# Altium PCB Zotino.PCBDOC (part 4 of 10)
Units mm, origin at the board's own origin, x right, y up, seen from the top; angles counter-clockwise.
Board outline 160.1 x 100.1 mm, 4 copper layers (TopLayer, Internal Plane 2, Signal Layer 1, BottomLayer), stack 1.563 mm thick; 759 components, 378 nets, 2272 pads, 779 vias.
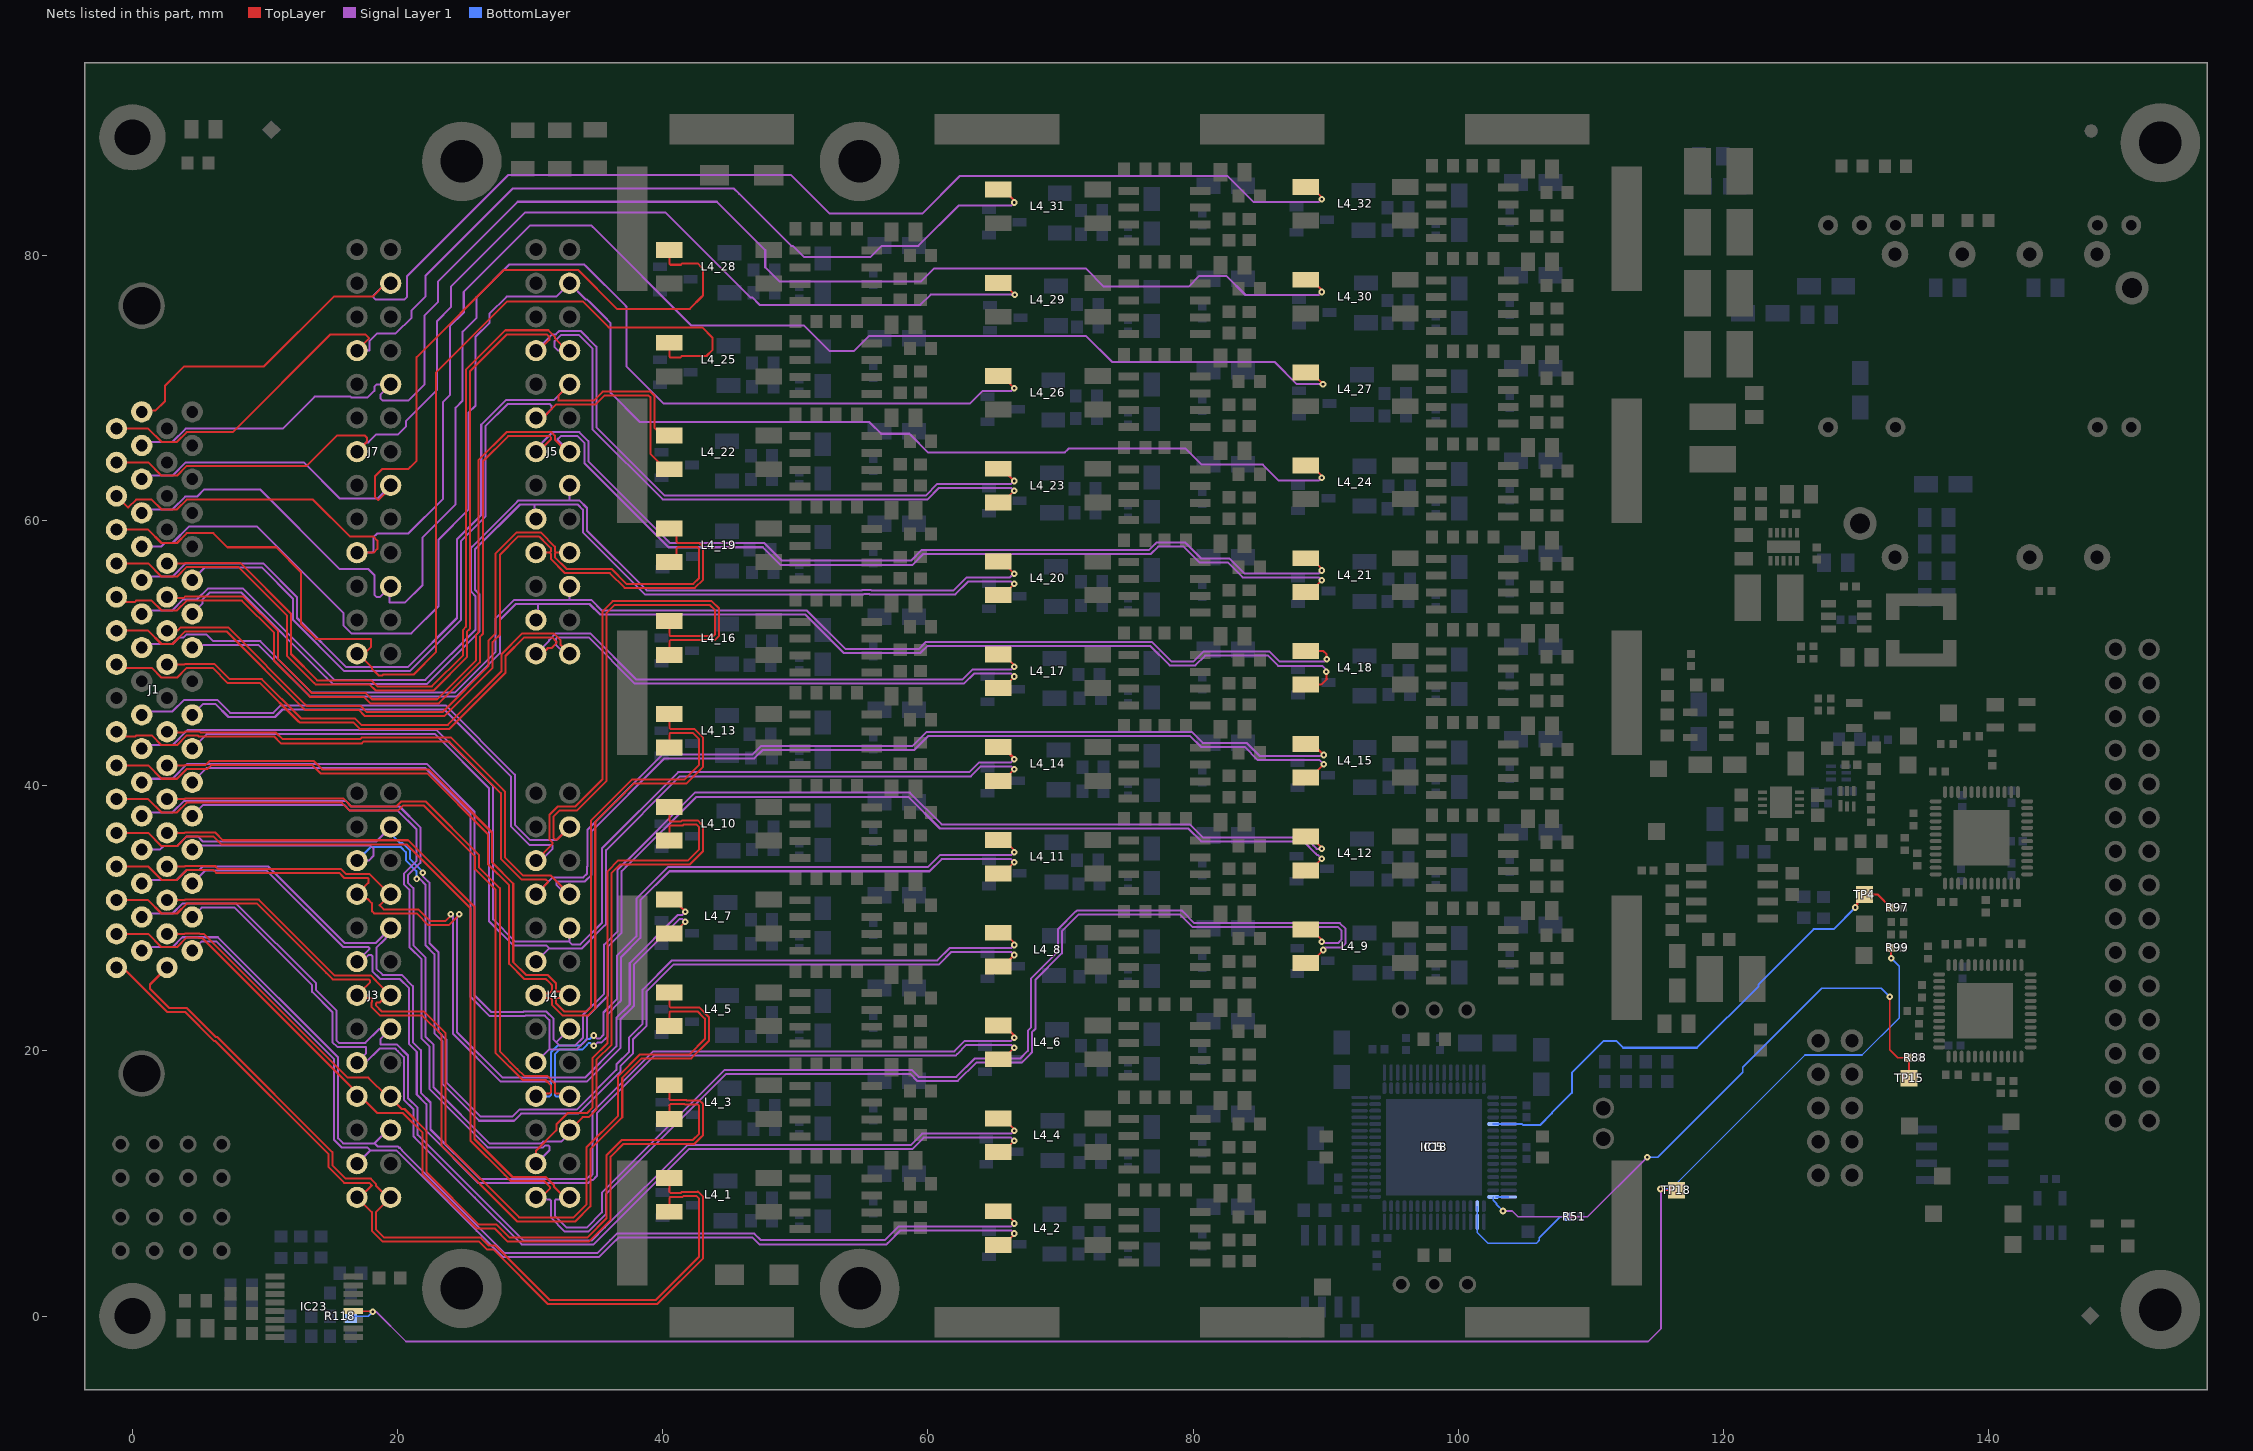
[diagram p5: the nets of this part, all layers, seen from the top]

## Part data (continued)
IC1: library part DC/DC_CC6-1212DF-E, "CONV DC/DC 6W DUAL 12V +-12V PCB", Manufacturer="TDK-Lambda Americas Inc.", Author=GK, Bonding=No, ComponentHeight=10.45mm, Component Type=Standard, CreateDate=17.12.2016, Device=CC6-1212DF-E, LatestRevisionDate=17.12.2016, Manufacturer Part Number=CC6-1212DF-E, Mounted=Yes, PackageDescription="CC6 Series, Body 0.900 x 0.831 x 0.335, Regulated", Part Description="CONV DC/DC 6W DUAL 12V +-12V PCB", Part Number=CC6-1212DF-E, Pin Count=7, PressFit=No, Sense=No, SMD=No, Socket=No
IC2_1 IC2_2 IC2_3 IC2_4 IC2_5 IC2_6 IC2_7 IC2_8 IC2_9 IC2_10 IC2_11 IC2_12 IC2_13 IC2_14 IC2_15 IC2_16 IC2_17 IC2_18 IC2_19 IC2_20 IC2_21 IC2_22 IC2_23 IC2_24 IC2_25 IC2_26 IC2_27 IC2_28 IC2_29 IC2_30 IC2_31 IC2_32: library part OA_OPA197, "36-V, Precision, Rail-to-Rail Input/Output, Low Offset Voltage, Operational Amplifiers", Case=SOIC8, Manufacturer="TEXAS INSTRUMENTS", Author=GK, Bonding=No, ComponentHeight=1.75mm, Component Type=Standard, CreateDate=22.07.2015, Device=OPA197ID, HelpURL=\\cern.ch\dfs\Applications\Altium\Datasheets\OPA192ID.pdf, LatestRevisionDate=22.07.2015, Manufacturer Part Number=OPA197ID, Mounted=Yes, PackageDescription="SOIC 8, Pitch 1.27mm - Body 4x5mm, IPC Medium Density", Part Description="36-V, Precision, Rail-to-Rail Input/Output, Low Offset Voltage, Operational Amplifiers", Part Number=OPA197ID, Pin Count=5, PressFit=No, Sense=No, SMD=Yes, Socket=No
IC3: "1ppm/°C, Low-Noise, Precision, +5.000V Voltage Reference", Case=SOIC8, Manufacturer=MAXIM, Author="CERN DEM JMW", Bonding=No, ComponentHeight=1.75mm, Component Type=Standard, CreateDate=06.07.2015, Device=MAX6250ACSA+, HelpURL=\\cern.ch\dfs\Applications\Altium\Datasheets\MAX6250ACSA+.pdf, LatestRevisionDate=06.07.2015, Manufacturer Part Number=MAX6250ACSA+, Mounted=Yes, PackageDescription="SOIC 8, Pitch 1.27mm, Body 4x5mm, IPC Medium Density", Part Description="1ppm/°C, Low-Noise, Precision, +5.000V Voltage Reference", Part Number=MAX6250ACSA+, Pin Count=5, PressFit=No, Sense=No, SMD=Yes, Socket=No
IC4: "200mA, Low Noise, Low Dropout Negative Micropower Regulator", Case=SOT23-5, Manufacturer="LINEAR TECHNOLOGY", Author="CERN DEM MR", Bonding=No, ComponentHeight=1mm, Component Type=Standard, CreateDate=17.02.2016, Device=LT1964ES5-BYP#TRMPBF, HelpURL=\\cern.ch\dfs\Applications\Altium\Datasheets\LT1964ES5-BYP#TRMPBF.pdf, LatestRevisionDate=17.02.2016, Manufacturer Part Number=LT1964ES5-BYP#TRMPBF, Mounted=Yes, PackageDescription="SOT23, 0.95mm pitch; 5 pin, 1.75mm W X 3.00mm L, IPC Medium Density", Part Description="-1.22V to -20V, 200mA, Low Noise, Low Dropout Negative Micropower Regulator", Part Number=LT1964ES5-BYP#TRMPBF, Pin Count=5, PressFit=No, Sense=No, SMD=Yes, Socket=No
IC5: library part DAC_AD5372_QFP, "32-Channel, 16-Bit, Serial Input, Voltage Output Digital-to-Analog Converter", Case=QFN64, Manufacturer="ANALOG DEVICES", Author=GK, Bonding=No, ComponentHeight=1mm, Component Type=Standard, CreateDate=14.03.2017, Device=AD5373BSTZ, HelpURL=\\cern.ch\dfs\Applications\Altium\Datasheets\AD5373BCPZ.pdf, LatestRevisionDate=14.03.2017, Manufacturer Part Number=AD5373BSTZ, Mounted=Yes, PackageDescription="TSQFP, 64-Leads, Body 10.00x10.00mm, Pitch 0.50mm, IPC High Density", Part Description="32-Channel, 16-Bit, Serial Input, Voltage Output Digital-to-Analog Converter", Part Number=AD5373BSTZ, Pin Count=64, PressFit=No, Sense=No, SMD=Yes, Socket=No
IC6: "9-72VDC to 3.3-15VDC, Iout (max) 500mA, DC-DC Converter", Manufacturer="XP POWER", Author="CERN DEM HF", Bonding=No, Component Type=Standard, ComponentHeight=10.4mm, CreateDate=12.07.2022, Device=JHM0612D12, HelpURL=\\cern.ch\dfs\Applications\Altium\Datasheets\JHM0X.pdf, LatestRevisionDate=12.07.2022, Manufacturer Part Number=JHM0612D12, Mounted=Yes, PackageDescription="JHM Series , Body 31.75 x 20.32mm", Part Description="10-17V to  ±12V ( ±250mA)  Power Supply", Part Number=JHM0612D12, Pin Count=9, PressFit=No, Sense=No, SMD=No, Socket=No, Status=None
IC7: "4.2V TO 18V INPUT, 2A LOW IQ SYNCHRONOUS BUCK CONVERTER", Case=SOT23-6, Manufacturer="DIODES INCORPORATED", Manufacturer Part Number=AP62201WU, Author="CERN DEM HF", Bonding=No, Component Type=Standard, ComponentHeight=1.1mm, CreateDate=07.01.2022, Device=AP62201WU-7, HelpURL=\\cern.ch\dfs\Applications\Altium\Datasheets\AP6220x.pdf, LatestRevisionDate=21.03.2022, Mounted=Yes, PackageDescription="SOT23, 0.95mm Pitch; 6 Pin, 1.625mm W X 2.90mm L X 1.00mm H body, IPC Medium Density", Part Description="4.2V To 18V Input, 2A Low Iq Synchronous Buck Converter", Part Number=AP62201WU-7, Pin Count=6, PressFit=No, Sense=No, SMD=Yes, Socket=No
IC8 IC9: "4-Channel Half-Duplex M-LVDS Line Transceiver", Case=QFN48, Manufacturer="TEXAS INSTRUMENTS", Author="CERN DEM JLC", Bonding=No, ComponentHeight=1mm, Component Type=Standard, CreateDate=17.03.2011, Device=SN65MLVD040RGZT, HelpURL=\\cern.ch\dfs\Applications\Altium\Datasheets\SN65MLVD040RGZT.pdf, LatestRevisionDate=17.03.2011, Manufacturer Part Number=SN65MLVD040RGZT, Mounted=Yes, PackageDescription="QFN, 0.50mm Pitch, Square; 48 Pin, 7.00mm L X 7.00mm W X 1mm H body (W/Thermal Tab 4.2mm X 4.2mm), IPC Medium Density", Part Description="4-Channel Half-Duplex M-LVDS Line Transceiver", Part Number=SN65MLVD040RGZT, Pin Count=49, PressFit=No, Sense=No, SMD=Yes, Socket=No
IC10: "1.7V-5.5V, 2K I2C™ Serial EEPROMs with EUI-48™ Node Identity", Case=SOIC8, Manufacturer="MICROCHIP TECHNOLOGY", Author="CERN DEM MR", Bonding=No, Component Type=Standard, ComponentHeight=1.75mm, CreateDate=19.07.2016, Device=24AA02E48-I/SN, HelpURL=\\cern.ch\dfs\Applications\Altium\Datasheets\24AA025E48-I-SN.pdf, LatestRevisionDate=19.07.2016, Manufacturer Part Number=24AA02E48-I/SN, Mounted=Yes, PackageDescription="SOIC, 1.27mm Pitch; 8 Pin - Body 4x5mm, IPC Medium Density", Part Description="1.7V-5.5V, 2K I2C™ Serial EEPROMs with EUI-48™ Node Identity", Part Number=24AA02E48-I/SN, Pin Count=8, PressFit=No, Sense=No, SMD=Yes, Socket=No
IC11: library part CMP-0476-00219-1, "200 mA, Low Noise, Low Dropout Negative Micropower Regulator, -1.9 to -20 V Vin, Adjustable Vout, 8-pin SON (DD-8), -40 to 125 degC, Pb-Free", Dropout Voltage(V)=0.34, Manufacturer="Linear Technology", Output Voltage=Adj, Shutdown Current(uA)=3, Code_JEDEC=MO-229, ComponentLink1Description="Manufacturer URL", ComponentLink1URL=http://www.linear.com/, ComponentLink2Description=Datasheet, ComponentLink2URL=http://cds.linear.com/docs/en/datasheet/1964fb.pdf, ComponentLink3Description="Package Specification", ComponentLink3URL=http://cds.linear.com/docs/en/packaging/DFN_8_05-08-1698.pdf, DatasheetVersion="Rev. B", Discrete Pass Element=no, Iout(mA)=200, Isupply(mA)=0.03, Mounting Technology="Surface Mount", Noise(uV)=30, Number of Outputs=1, PackageDescription="8-Pin Plastic DFN, Body 3 x 3 mm, Pitch 0.5 mm", PackageReference=DD-8, PackageVersion=Jun-10, PartNumber=LT1964EDD#PBF, PSRR(dB)=54, RoHS=TRUE, Vin Max(V)=-1.9, Vin Min(V)=-20, Vout Max(V)=-1.22, Vout Min(V)=-20
IC12 IC13: "Supervisory Circuits Low-quiescent current 1% accuracy supervisor with programmable delay", Manufacturer_Name="Texas Instruments", Mouser Part Number=595-TPS389001DSET, Datasheet Link=https://www.ti.com/general/docs/suppproductinfo.tsp?distId=10&gotoUrl=https%3A%2F%2Fwww.ti.com%2Flit%2Fgpn%2Ftps3890, Height=0.8mm, Manufacturer Part Number=TPS389001DSET, Mouser Price/Stock=https://www.mouser.co.uk/ProductDetail/Texas-Instruments/TPS389001DSET?qs=dSktwyqbRaUv%2FgF0PRoIcw%3D%3D
IC14: "Integrated Circuit", Manufacturer_Name="Texas Instruments", Mouser Part Number=926-LM4040CIM3-50, Arrow Part Number=LM4040CIM3-5.0, Arrow Price/Stock=https://www.arrow.com/en/products/lm4040cim3-5.0/texas-instruments?region=nac, Datasheet Link=http://www.ti.com/lit/ds/symlink/lm4040-n.pdf, Height=1.12mm, Manufacturer Part Number=LM4040CIM3-5.0, Mouser Price/Stock=https://www.mouser.co.uk/ProductDetail/Texas-Instruments/LM4040CIM3-50?qs=QbsRYf82W3GkYEk3maEP0Q%3D%3D
IC18: library part DAC_AD5372, "32-Channel, 16-Bit, Serial Input, Voltage Output Digital-to-Analog Converter", Case=QFN64, Manufacturer="ANALOG DEVICES", Author=GK, Bonding=No, ComponentHeight=1mm, Component Type=Standard, CreateDate=14.03.2017, Device=AD5372BCPZ, HelpURL=\\cern.ch\dfs\Applications\Altium\Datasheets\AD5373BCPZ.pdf, LatestRevisionDate=14.03.2017, Manufacturer Part Number=AD5372BCPZ, Mounted=Yes, PackageDescription="QFN, 0.50mm Pitch, Square; 64 Pin, 9.00mm L X 9.00mm W X 1.00mm H Body (7.25 X 7.25mm Thermal Tab), IPC Medium Density", Part Description="32-Channel, 16-Bit, Serial Input, Voltage Output Digital-to-Analog Converter", Part Number=AD5372BCPZ, Pin Count=65, PressFit=No, Sense=No, SMD=Yes, Socket=No
IC19: "Microprocessor Reset Circuit", Case=SOT143, Manufacturer="ST MICROELECTRONICS", Author="CERN DEM JLC", Bonding=No, ComponentHeight=1.12mm, Component Type=Standard, CreateDate=17.11.2016, Device=STM811SW16F, HelpURL=\\cern.ch\dfs\Applications\Altium\Datasheets\STM811SW16F.pdf, LatestRevisionDate=17.11.2016, Manufacturer Part Number=STM811SW16F, Mounted=Yes, PackageDescription="SOT143, 4-Leads, Body 3.0x2.6mm (max), Pitch 1.92mm, IPC Medium Density", Part Description="2.93V Reset Threshold Voltage Microprocessor Reset Circuit", Part Number=STM811SW16F, Pin Count=4, PressFit=No, Sense=No, SMD=Yes, Socket=No
IC23: "8-Bit Shift Register With 3-State Output Register", Case=TSSOP16, Manufacturer="TEXAS INSTRUMENTS", Author="CERN DEM JLC", Bonding=No, ComponentHeight=1.2mm, Component Type=Standard, CreateDate=10.05.2012, Device=SN74LV595APWT, HelpURL=\\cern.ch\dfs\Applications\Altium\Datasheets\SN74LV595APWT.pdf, LatestRevisionDate=10.05.2012, Manufacturer Part Number=SN74LV595APWT, Mounted=Yes, PackageDescription="SOP, 0.65mm pitch; 16 pin, 4.40mm W X 5.00mm L X 1.20mm H body IPC Medium Density", Part Description="8-Bit Shift Register With 3-State Output Register", Part Number=SN74LV595APWT, Pin Count=16, PressFit=No, Sense=No, SMD=Yes, Socket=No
IC27: "1.22V to 20V 500mA, Low Noise, LDO Adjustable Micropower Regulator", Case=SOIC8, Manufacturer="LINEAR TECHNOLOGY", Author="CERN DEM JLC", Bonding=No, ComponentHeight=1.75mm, Component Type=Standard, CreateDate=11.01.2010, Device=LT1763CS8#PBF, HelpURL=\\cern.ch\dfs\Applications\Altium\Datasheets\LT1763CS8#PBF.pdf, LatestRevisionDate=11.01.2010, Manufacturer Part Number=LT1763CS8#PBF, Mounted=Yes, PackageDescription="SOIC 8, Pitch 1.27mm, Body 4x5mm, IPC Medium Density", Part Description="1.22V to 20V 500mA, Low Noise, LDO Adjustable Micropower Regulator", Part Number=LT1763CS8#PBF, Pin Count=8, PressFit=No, Sense=No, SMD=Yes, Socket=No
IC32: "1.7V-5.5V, 2K I2C Serial EEPROM With EUI-48 Node Identity", Case=SOT23-5, Manufacturer="MICROCHIP TECHNOLOGY", Author="CERN DEM MR", Bonding=No, ComponentHeight=1.45mm, Component Type=Standard, CreateDate=31.03.2016, Device=24AA02E48T-I/OT, HelpURL=\\cern.ch\dfs\Applications\Altium\Datasheets\24AA02E48T-I-OT.pdf, LatestRevisionDate=31.03.2016, Manufacturer Part Number=24AA02E48T-I/OT, Mounted=Yes, PackageDescription="SOT, 0.95mm pitch; 5 pin, 1.60mm W X 2.90mm L X 1.45mm H body, IPC Medium Density", Part Description="1.7V-5.5V, 2K I2C Serial EEPROM With EUI-48 Node Identity", Part Number=24AA02E48T-I/OT, Pin Count=5, PressFit=No, Sense=No, SMD=Yes, Socket=No
IC35: "4.75-28VDC to 1-6VDC, 500mA Step-Down Converter With Sleep Mode", Case=SON10, Manufacturer="TEXAS INSTRUMENTS", Author="CERN DEM JMW", Bonding=No, ComponentHeight=0.8mm, Component Type=Standard, CreateDate=11.08.2015, Device=TPS62175DQC, HelpURL=\\cern.ch\dfs\Applications\Altium\Datasheets\TPS62175DQC.pdf, LatestRevisionDate=11.08.2015, Manufacturer Part Number=TPS62175DQC, Mounted=Yes, PackageDescription="SON, 10-Leads, Body 2x3mm, Pitch 0.5mm, Thermal Pad 0.94x2.5mm, IPC Medium Density", Part Description="4.75-28VDC to 1-6VDC, 500mA Step-Down Converter With Sleep Mode", Part Number=TPS62175DQC, Pin Count=11, PressFit=No, Sense=No, SMD=Yes, Socket=No
J1: library part TYCO_5787082-7, "68 contacts, AMPLIMITE .050\", Right Angled Receptacle Series III", Manufacturer="TYCO ELECTRONICS", Manufacturer Part Number=5787082-7, Author="CERN DEM JLC", Component Type=Standard, ComponentHeight=9.5mm, CreateDate=13.03.2017, Family=D-SUB, HelpURL=\\cern.ch\dfs\Applications\Altium\Datasheets\TYCO_5787082-7.pdf, LatestRevisionDate=13.03.2017, Mounted=Yes, Part Description="68 contacts, AMPLIMITE .050\", Right Angled Receptacle Series III", Part Number=TYCO_5787082-7, Pin Count=70, PressFit=No, Sense=No, SMD=No, Socket=No, Status=None, System=Connector
J2: library part 3M_N2510-6002RB, "Connector 10 Male", Manufacturer=3M, Manufacturer Part Number=N2510-6002RB, Author="CERN DEM JLC", Component Type=Standard, ComponentHeight=10.03mm, CreateDate=11.02.2009, Family="Header 10", HelpURL=\\cern.ch\dfs\Applications\Altium\Datasheets\3M_N2510-6002RB.pdf, LatestRevisionDate=11.08.2009, Mounted=Yes, Part Description="10 Contacts - Straight .100'' x .100'' Low Profile Four-Wall Header, 2500 Series", Part Number=3M_N2510-6002RB, Pin Count=10, PressFit=No, Sense=No, SMD=No, Socket=No, Status=None
J3 J4 J5 J7: library part 3M_N2526-6002RB, "Connector 26 Male", Manufacturer=3M, Manufacturer Part Number=N2526-6002RB, Author="CERN DEM JLC", ComponentHeight=10.03mm, Component Type=Standard, CreateDate=11.02.2009, Family="Header 26", HelpURL=\\cern.ch\dfs\Applications\Altium\Datasheets\3M_N2526-6002RB.pdf, LatestRevisionDate=11.08.2009, Mounted=Yes, Part Description="26 Contacts - Straight .100'' x .100'' Low Profile Four-Wall Header, 2500 Series", Part Number=3M_N2526-6002RB, Pin Count=26, PressFit=No, Sense=No, SMD=No, Socket=No, Status=None
J37: library part 3M_N2530-6002RB, "Connector 30 Male", Manufacturer=3M, Manufacturer Part Number=N2530-6002RB, Author="CERN DEM JLC", ComponentHeight=10.03mm, Component Type=Standard, CreateDate=11.02.2009, Family="Header 30", HelpURL=\\cern.ch\dfs\Applications\Altium\Datasheets\3M_N2530-6002RB.pdf, LatestRevisionDate=11.08.2009, Mounted=Yes, Part Description="30 Contacts - Straight .100'' x .100'' Low Profile Four-Wall Header, 2500 Series", Part Number=3M_N2530-6002RB, Pin Count=30, PressFit=No, Sense=No, SMD=No, Socket=No, Status=None
L1 L6 L7 L8 L9 L15 L16: library part IND_10UH_10%_MURATA-PS_8400, "Inductor With Core", Manufacturer="MURATA POWER SOLUTIONS", Manufacturer Part Number=84103C, Power=950mA, Resistance=0.24R, Tolerance=±10%, Author="CERN DEM JLC", ComponentHeight=2.9mm, Component Type=Standard, CreateDate=02.07.2012, HelpURL=\\cern.ch\dfs\Applications\Altium\Datasheets\IND_MURATA-PS_8400.pdf, LatestRevisionDate=02.07.2012, Mounted=Yes, Part Description="Miniature Surface Mount Power Inductor (8400 Serie)", Part Number=IND_10UH_10%_MURATA-PS_8400, Pin Count=2, Sense=No, SMD=Yes, Socket=No, Status=None
L2: library part IND_3.3UH_30%_WURTH_WE-TPC_744043003, "Inductor With Core", Manufacturer="WURTH ELEKTRONIK", Manufacturer Part Number=744043003, Power=2.15A, Resistance=0.03R, Tolerance=±30%, Author="CERN DEM JLC", Component Type=Standard, ComponentHeight=3mm, CreateDate=12.07.2011, HelpURL=\\cern.ch\dfs\Applications\Altium\Datasheets\IND_WURTH_WE-TPC_744043003.pdf, LatestRevisionDate=24.01.2012, Mounted=Yes, Part Description="Shielded Tiny Power Inductor (WE-TPC Serie)", Part Number=IND_3.3UH_30%_WURTH_WE-TPC_744043003, Pin Count=2, Sense=No, SMD=Yes, Socket=No
L4_1 L4_2 L4_3 L4_4 L4_5 L4_6 L4_7 L4_8 L4_9 L4_10 L4_11 L4_12 L4_13 L4_14 L4_15 L4_16 L4_17 L4_18 L4_19 L4_20 L4_21 L4_22 L4_23 L4_24 L4_25 L4_26 L4_27 L4_28 L4_29 L4_30 L4_31 L4_32: library part IND_6.5MH_50%_WURTH_WE-SL2-744229, "Inductor Common Mode", Manufacturer="WURTH ELEKTRONIK", Manufacturer Part Number=744229, Power=400mA, Resistance=0.95R, Tolerance=±50%, Author="CERN DEM JLC", ComponentHeight=5.3mm, Component Type=Standard, CreateDate=01.10.2012, HelpURL=\\cern.ch\dfs\Applications\Altium\Datasheets\IND_WURTH_WE-SL2_744229.pdf, LatestRevisionDate=15.10.2012, Mounted=Yes, Part Description="Common Mode SMD Line Filter (WE-SL2 Serie)", Part Number=IND_6.5MH_50%_WURTH_WE-SL2-744229, Pin Count=4, Sense=No, SMD=Yes, Socket=No, Status=None
LD4 LD5: library part LED_BIVAR_H485CGDL, "LED x4 Green 1C2A-BOT_3C4A_5C6A_7C8A-TOP", Manufacturer=BIVAR, Manufacturer Part Number=H485CGDL, Author="CERN DEM JLC", Bonding=No, Color=Green, ComponentHeight=11.3mm, Component Type=Standard, CreateDate=04.06.2012, HelpURL=\\cern.ch\dfs\Applications\Altium\Datasheets\LED_BIVAR_H485CGDL.pdf, LatestRevisionDate=04.06.2012, Mounted=Yes, PackageDescription="Quad-Level 2mm Green, PCB Edge Mounting  BIVAR H485CHDL", Part Description="Quad-Level 2mm Green LED, PCB Edge Mounting", Part Number=LED_BIVAR_H485CGDL, Pin Count=8, PressFit=No, Sense=No, SMD=No, Socket=No
R1 R15 R26 R68_1 R68_2 R68_3 R68_4 R68_5 R68_6 R68_7 R68_8 R68_9 R68_10 R68_11 R68_12 R68_13 R68_14 R68_15 R68_16 R68_17 R68_18 R68_19 R68_20 R68_21 R68_22 R68_23 R68_24 R68_25 R68_26 R68_27 R68_28 R68_29 R68_30 R68_31 R68_32: library part R0603_NO-VALUE, "Resistor", Case=0603, Author="CERN DEM JLC", Component Type=Standard, CreateDate=03.12.2007, HelpURL=Undefined, LatestRevisionDate=13.03.2008, Manufacturer=Undefined, Manufacturer1 ComponentHeight=Undefined, Manufacturer1 Example=Undefined, Manufacturer1 Part Number=Undefined, Manufacturer Part Number=R0603_NO-VALUE, Mounted=No, Part Description="Reserved Footprint For a 0603 (1608) Chip Resistor", Part Number=R0603_NO-VALUE, Pin Count=2, Sense=No, SMD=Yes, Socket=No, Status=None
R2 R3 R11 R13 R14 R37 R41 R42 R51 R88 R97 R99 R101: library part R0402_0R_JUMPER, "Resistor", Case=0402, Manufacturer=GENERIC, Manufacturer1 ComponentHeight=0.4mm, Manufacturer1 Example="YAGEO PHYCOMP", Manufacturer1 Part Number=232270591001L, Author="CERN DEM JLC", Component Type=Standard, CreateDate=03.12.2007, HelpURL=\\cern.ch\dfs\Applications\Altium\Datasheets\R0402_Phycomp_RC0402.pdf, LatestRevisionDate=17.10.2012, Manufacturer Part Number=R0402_0R_JUMPER, Mounted=Yes, Part Description="1A (0.05R Max DC Resistance) Zero Ohm Jumper", Part Number=R0402_0R_JUMPER, Pin Count=2, Sense=No, SMD=Yes, Socket=No, Status="Not recommended"
R4: library part R0603_36K_1%_0.1W_100PPM, "Resistor - 1%", Case=0603, Manufacturer=GENERIC, Manufacturer1 ComponentHeight=0.55mm, Manufacturer1 Example="NIC COMPONENT", Manufacturer1 Part Number=NRC06F3602TRF, Power=0.1W, Tolerance=±1%, Author="CERN DEM JLC", Component Type=Standard, CreateDate=03.12.2007, HelpURL=\\cern.ch\dfs\Applications\Altium\Datasheets\R0603_NIC_NRC.pdf, LatestRevisionDate=13.03.2008, Manufacturer Part Number=R0603_36K_1%_0.1W_100PPM, Mounted=Yes, Part Description="General Purpose Thick Film Chip Resistor", Part Number=R0603_36K_1%_0.1W_100PPM, Pin Count=2, PressFit=No, Sense=No, SMD=Yes, Socket=No, Status=Preferred, TC=±100ppm/°C
R5_1 R5_2 R5_3 R5_4 R5_5 R5_6 R5_7 R5_8 R5_9 R5_10 R5_11 R5_12 R5_13 R5_14 R5_15 R5_16 R5_17 R5_18 R5_19 R5_20 R5_21 R5_22 R5_23 R5_24 R5_25 R5_26 R5_27 R5_28 R5_29 R5_30 R5_31 R5_32 R7_1 R7_2 R7_3 R7_4 R7_5 R7_6 R7_7 R7_8 R7_9 R7_10 R7_11 R7_12 R7_13 R7_14 R7_15 R7_16 R7_17 R7_18 R7_19 R7_20 R7_21 R7_22 R7_23 R7_24 R7_25 R7_26 R7_27 R7_28 R7_29 R7_30 R7_31 R7_32 R40: library part R0603_1K_1%_0.1W_100PPM, "Resistor - 1%", Case=0603, Manufacturer=GENERIC, Manufacturer1 ComponentHeight=0.55mm, Manufacturer1 Example="NIC COMPONENT", Manufacturer1 Part Number=NRC06F1001TRF, Power=0.1W, Tolerance=±1%, Author="CERN DEM JLC", Component Type=Standard, CreateDate=03.12.2007, HelpURL=\\cern.ch\dfs\Applications\Altium\Datasheets\R0603_NIC_NRC.pdf, LatestRevisionDate=13.03.2008, Manufacturer Part Number=R0603_1K_1%_0.1W_100PPM, Mounted=Yes, Part Description="General Purpose Thick Film Chip Resistor", Part Number=R0603_1K_1%_0.1W_100PPM, Pin Count=2, PressFit=No, Sense=No, SMD=Yes, Socket=No, Status=Preferred, TC=±100ppm/°C
R6 R16 R17 R18 R19 R20 R21 R22 R23 R141 R144 R147 R151 R157 R160 R163 R166 R170: library part R0402_100R_1%_0.1W_100PPM, "Resistor - 1%", Case=0402, Manufacturer=GENERIC, Manufacturer1 ComponentHeight=0.4mm, Manufacturer1 Example=PANASONIC, Manufacturer1 Part Number=ERJ2RKF1000X, Manufacturer Part Number=R0402_100R_1%_0.1W_100PPM_50V, Power=0.1W, Tolerance=±1%, Voltage=50V, Author="CERN DEM JLC", Component Type=Standard, CreateDate=12.12.2013, HelpURL=\\cern.ch\dfs\Applications\Altium\Datasheets\R0402_PANASONIC_ERJ2RK.pdf, LatestRevisionDate=03.03.2015, Mounted=Yes, Part Description="General Purpose Thick Film Chip Resistor", Part Number=R0402_100R_1%_0.1W_100PPM, Pin Count=2, Sense=No, SMD=Yes, Socket=No, Status="Not recommended", TC=±100ppm/°C
R8 R9 R10 R12 R58 R82 R113 R114 R115 R116 R117 R118 R119 R120 R121 R122 R123: library part R0603_220R_1%_0.1W_100PPM, "Resistor - 1%", Case=0603, Manufacturer=GENERIC, Manufacturer1 ComponentHeight=0.55mm, Manufacturer1 Example="NIC COMPONENT", Manufacturer1 Part Number=NRC06F2200TRF, Power=0.1W, Tolerance=±1%, Author="CERN DEM JLC", Component Type=Standard, CreateDate=03.12.2007, HelpURL=\\cern.ch\dfs\Applications\Altium\Datasheets\R0603_NIC_NRC.pdf, LatestRevisionDate=13.03.2008, Manufacturer Part Number=R0603_220R_1%_0.1W_100PPM, Mounted=Yes, Part Description="General Purpose Thick Film Chip Resistor", Part Number=R0603_220R_1%_0.1W_100PPM, Pin Count=2, Sense=No, SMD=Yes, Socket=No, Status=Preferred, TC=±100ppm/°C
R24_1 R24_2 R24_3 R24_4 R24_5 R24_6 R24_7 R24_8 R24_9 R24_10 R24_11 R24_12 R24_13 R24_14 R24_15 R24_16 R24_17 R24_18 R24_19 R24_20 R24_21 R24_22 R24_23 R24_24 R24_25 R24_26 R24_27 R24_28 R24_29 R24_30 R24_31 R24_32: library part R0603_2K32_0.1%_0.063W_10PPM, "Resistor - 0.1%", Case=0603, Manufacturer=GENERIC, Manufacturer1 ComponentHeight=0.5mm, Manufacturer1 Example="TYCO HOLSWORTHY", Manufacturer1 Part Number=RN73C1J2K32BTDF, Power=0.063W, Tolerance=±0.1%, Author="CERN DEM JLC", Component Type=Standard, CreateDate=03.12.2007, HelpURL=\\cern.ch\dfs\Applications\Altium\Datasheets\R0603_Tyco_RN73.pdf, LatestRevisionDate=13.03.2008, Manufacturer Part Number=R0603_2K32_0.1%_0.063W_10PPM, Mounted=Yes, Part Description="Thin Film Chip Resistor", Part Number=R0603_2K32_0.1%_0.063W_10PPM, Pin Count=2, Sense=No, SMD=Yes, Socket=No, Status="Not recommended", TC=±10ppm
R25_1 R25_2 R25_3 R25_4 R25_5 R25_6 R25_7 R25_8 R25_9 R25_10 R25_11 R25_12 R25_13 R25_14 R25_15 R25_16 R25_17 R25_18 R25_19 R25_20 R25_21 R25_22 R25_23 R25_24 R25_25 R25_26 R25_27 R25_28 R25_29 R25_30 R25_31 R25_32: library part R0603_9K09_0.1%_0.063W_10PPM, "Resistor - 0.1%", Case=0603, Manufacturer=GENERIC, Manufacturer1 ComponentHeight=0.5mm, Manufacturer1 Example="TYCO HOLSWORTHY", Manufacturer1 Part Number=RN73C1J9K09BTDF, Power=0.063W, Tolerance=±0.1%, Author="CERN DEM JLC", Component Type=Standard, CreateDate=03.12.2007, HelpURL=\\cern.ch\dfs\Applications\Altium\Datasheets\R0603_Tyco_RN73.pdf, LatestRevisionDate=13.03.2008, Manufacturer Part Number=R0603_9K09_0.1%_0.063W_10PPM, Mounted=Yes, Part Description="Thin Film Chip Resistor", Part Number=R0603_9K09_0.1%_0.063W_10PPM, Pin Count=2, Sense=No, SMD=Yes, Socket=No, Status="Not recommended", TC=±10ppm
R27: library part R0603_12K7_0.1%_0.063W_10PPM, "Resistor - 0.1%", Case=0603, Manufacturer=GENERIC, Manufacturer1 ComponentHeight=0.5mm, Manufacturer1 Example="TYCO HOLSWORTHY", Manufacturer1 Part Number=RN73C1J12K7BTDF, Power=0.063W, Tolerance=±0.1%, Author="CERN DEM JLC", Component Type=Standard, CreateDate=03.12.2007, HelpURL=\\cern.ch\dfs\Applications\Altium\Datasheets\R0603_Tyco_RN73.pdf, LatestRevisionDate=13.03.2008, Manufacturer Part Number=R0603_12K7_0.1%_0.063W_10PPM, Mounted=Yes, Part Description="Thin Film Chip Resistor", Part Number=R0603_12K7_0.1%_0.063W_10PPM, Pin Count=2, PressFit=No, Sense=No, SMD=Yes, Socket=No, Status="Not Recommended", TC=±10ppm
R28 R29: library part R0603_0R_JUMPER, "Resistor", Case=0603, Manufacturer=GENERIC, Manufacturer1 ComponentHeight=0.55mm, Manufacturer1 Example="NIC COMPONENT", Manufacturer1 Part Number=NRC06Z0, Author="CERN DEM JLC", Component Type=Standard, CreateDate=03.12.2007, HelpURL=\\cern.ch\dfs\Applications\Altium\Datasheets\R0603_NIC_NRC.pdf, LatestRevisionDate=13.03.2008, Manufacturer Part Number=R0603_0R_JUMPER, Mounted=Yes, Part Description="1A (0.05R Max DC Resistance) Zero Ohm Jumper", Part Number=R0603_0R_JUMPER, Pin Count=2, PressFit=No, Sense=No, SMD=Yes, Socket=No, Status=Preferred
R30 R31 R32: library part R1206_NO-VALUE, "Resistor", Case=1206, Manufacturer1 ComponentHeight=0.65mm, Author="CERN DEM JLC", Component Type=Standard, CreateDate=03.12.2007, HelpURL=Undefined, LatestRevisionDate=13.03.2008, Manufacturer=Undefined, Manufacturer1 Example=Undefined, Manufacturer1 Part Number=Undefined, Manufacturer Part Number=R1206_NO-VALUE, Mounted=No, Part Description="Reserved Footprint For a 1206 (3216) Chip Resistor", Part Number=R1206_NO-VALUE, Pin Count=2, PressFit=No, Sense=No, SMD=Yes, Socket=No, Status=None
R33: library part R0402_31K6_0.1%_0.063W_25PPM_YAGEO_RT, "Resistor - 0.1%", Case=0402, Manufacturer=YAGEO, Manufacturer Part Number=RT0402BRD0731K6L, Power=0.063W, Tolerance=±0.1%, Voltage=50V, Author="CERN DEM BC", Component Type=Standard, ComponentHeight=0.35mm, CreateDate=30.07.2020, HelpURL=\\cern.ch\dfs\Applications\Altium\Datasheets\R0402_YAGEO_RT.pdf, LatestRevisionDate=30.07.2020, Mounted=Yes, Part Description="Thin Film Chip Resistor", Part Number=R0402_31K6_0.1%_0.063W_25PPM_YAGEO_RT, Pin Count=2, PressFit=No, Sense=No, SMD=Yes, Socket=No, Status="Not Recommended", TC=±25ppm/°C
R34 R36 R38 R171: library part R0402_10K_1%_0.0625W_100PPM, "Resistor - 1%", Case=0402, Manufacturer=GENERIC, Manufacturer1 ComponentHeight=0.4mm, Manufacturer1 Example="YAGEO PHYCOMP", Manufacturer1 Part Number=232270671003L, Power=0.0625W, Tolerance=±1%, Author="CERN DEM JLC", Component Type=Standard, CreateDate=03.12.2007, HelpURL=\\cern.ch\dfs\Applications\Altium\Datasheets\R0402_Phycomp_RC0402.pdf, LatestRevisionDate=17.10.2012, Manufacturer Part Number=R0402_10K_1%_0.0625W_100PPM, Mounted=Yes, Part Description="General Purpose Thick Film Chip Resistor", Part Number=R0402_10K_1%_0.0625W_100PPM, Pin Count=2, Sense=No, SMD=Yes, Socket=No, Status="Not recommended", TC=±100ppm/°C
R35 R39 R43 R69 R150: library part R0603_24K_1%_0.1W_100PPM, "Resistor - 1%", Case=0603, Manufacturer=GENERIC, Manufacturer1 ComponentHeight=0.55mm, Manufacturer1 Example="NIC COMPONENT", Manufacturer1 Part Number=NRC06F2402TRF, Power=0.1W, Tolerance=±1%, Author="CERN DEM JLC", Component Type=Standard, CreateDate=03.12.2007, HelpURL=\\cern.ch\dfs\Applications\Altium\Datasheets\R0603_NIC_NRC.pdf, LatestRevisionDate=13.03.2008, Manufacturer Part Number=R0603_24K_1%_0.1W_100PPM, Mounted=Yes, Part Description="General Purpose Thick Film Chip Resistor", Part Number=R0603_24K_1%_0.1W_100PPM, Pin Count=2, Sense=No, SMD=Yes, Socket=No, Status=Preferred, TC=±100ppm/°C
R44 R70 R153: library part R0603_2K7_1%_0.1W_100PPM, "Resistor - 1%", Case=0603, Manufacturer=GENERIC, Manufacturer1 ComponentHeight=0.55mm, Manufacturer1 Example="YAGEO PHYCOMP", Manufacturer1 Part Number=RC0603FR-072K7L, Power=0.1W, Tolerance=±1%, Author="CERN DEM JLC", Component Type=Standard, CreateDate=02.05.2011, HelpURL=\\cern.ch\dfs\Applications\Altium\Datasheets\R0603_PHYCOMP_RC0603.pdf, LatestRevisionDate=02.05.2011, Manufacturer Part Number=R0603_2K7_1%_0.1W_100PPM, Mounted=Yes, Part Description="General Purpose Thick Film Chip Resistor", Part Number=R0603_2K7_1%_0.1W_100PPM, Pin Count=2, Sense=No, SMD=Yes, Socket=No, Status=Preferred, TC=±100ppm/°C
R67_1 R67_2 R67_3 R67_4 R67_5 R67_6 R67_7 R67_8 R67_9 R67_10 R67_11 R67_12 R67_13 R67_14 R67_15 R67_16 R67_17 R67_18 R67_19 R67_20 R67_21 R67_22 R67_23 R67_24 R67_25 R67_26 R67_27 R67_28 R67_29 R67_30 R67_31 R67_32: library part R0603_11K_1%_0.1W_100PPM, "Resistor - 1%", Case=0603, Manufacturer=GENERIC, Manufacturer1 ComponentHeight=0.55mm, Manufacturer1 Example="NIC COMPONENT", Manufacturer1 Part Number=NRC06F1102TRF, Power=0.1W, Tolerance=±1%, Author="CERN DEM JLC", Component Type=Standard, CreateDate=03.12.2007, HelpURL=\\cern.ch\dfs\Applications\Altium\Datasheets\R0603_NIC_NRC.pdf, LatestRevisionDate=13.03.2008, Manufacturer Part Number=R0603_11K_1%_0.1W_100PPM, Mounted=Yes, Part Description="General Purpose Thick Film Chip Resistor", Part Number=R0603_11K_1%_0.1W_100PPM, Pin Count=2, Sense=No, SMD=Yes, Socket=No, Status=Preferred, TC=±100ppm/°C
R162: library part R0603_270K_1%_0.1W_100PPM, "Resistor - 1%", Case=0603, Manufacturer=GENERIC, Manufacturer1 ComponentHeight=0.55mm, Manufacturer1 Example="NIC COMPONENT", Manufacturer1 Part Number=NRC06F2703TRF, Power=0.1W, Tolerance=±1%, Author="CERN DEM JLC", Component Type=Standard, CreateDate=03.12.2007, HelpURL=\\cern.ch\dfs\Applications\Altium\Datasheets\R0603_NIC_NRC.pdf, LatestRevisionDate=13.03.2008, Manufacturer Part Number=R0603_270K_1%_0.1W_100PPM, Mounted=Yes, Part Description="General Purpose Thick Film Chip Resistor", Part Number=R0603_270K_1%_0.1W_100PPM, Pin Count=2, Sense=No, SMD=Yes, Socket=No, Status=Preferred, TC=±100ppm/°C
R164: library part R0603_82K_1%_0.1W_100PPM, "Resistor - 1%", Case=0603, Manufacturer=GENERIC, Manufacturer1 ComponentHeight=0.55mm, Manufacturer1 Example="NIC COMPONENT", Manufacturer1 Part Number=NRC06F8202TRF, Power=0.1W, Tolerance=±1%, Author="CERN DEM JLC", Component Type=Standard, CreateDate=03.12.2007, HelpURL=\\cern.ch\dfs\Applications\Altium\Datasheets\R0603_NIC_NRC.pdf, LatestRevisionDate=13.03.2008, Manufacturer Part Number=R0603_82K_1%_0.1W_100PPM, Mounted=Yes, Part Description="General Purpose Thick Film Chip Resistor", Part Number=R0603_82K_1%_0.1W_100PPM, Pin Count=2, Sense=No, SMD=Yes, Socket=No, Status=Preferred, TC=±100ppm/°C
RT1: library part THERM_NTC_10K_EPCOS_B57330V2103J260, "Thermistor NTC (Negative Temperature Coefficient)", Case=0603, Manufacturer=EPCOS, Manufacturer Part Number=B57330V2103J260, Power=180mW, Tolerance=±5%, Author="CERN DEM BC", ComponentHeight=0.9mm, Component Type=Standard, CreateDate=30.07.2015, HelpURL=\\cern.ch\dfs\Applications\Altium\Datasheets\THERM_EPCOS_B573xxV2.pdf, LatestRevisionDate=30.07.2015, Mounted=Yes, Part Description="SMD NTC Thermistor for Temperature Measurement", Part Number=THERM_NTC_10K_EPCOS_B57330V2103J260, Pin Count=2, Sense=No, SMD=Yes, Socket=No, Status=None
SCREW1 SCREW2: library part MECH_Tyco_SCSI_Screwlock, "SCSI Screw Lock", Manufacturer="TYCO ELECTRONICS", Manufacturer Part Number=786585-2, Part Number=TYCO_786585-2, Author=GK, ComponentHeight=9.02mm, Component Type=Mechanical, CreateDate=10.09.2013, LatestRevisionDate=10.09.2013, Mounted=Yes, PackageDescription="50SR SCREWLOCK KIT, FEMALE", Part Description="50SR SCREWLOCK KIT, FEMALE", Pin Count=0, PressFit=No, Sense=No, SMD=No, Socket=No, Status=None
TEC1: library part TEC_CP20147H, "Peltier Module 15x15 mm"
TP1 TP2 TP3 TP4 TP5 TP6 TP7 TP8 TP9 TP10 TP11 TP12 TP13 TP14 TP15 TP16 TP17 TP18: library part SMD_PAD_1.27X1.27MM, Author="CERN DEM JLC", ComponentHeight=0mm, Component Type="Standard (No BOM)", CreateDate=12.01.2008, Family="Test Point", HelpURL=Undefined, LatestRevisionDate=12.01.2008, Mounted=No, PackageDescription="1.27mm x 1.27mm PCB Copper Area (SMD Test Point)", Part Description="1.27mm x 1.27mm PCB Copper Area (SMD Test Point)", Part Number=SMD_PAD_1.27X1.27MM, Pin Count=1, Sense=No, SMD=Yes, Socket=No, Status=None

## Free pads (board coordinates)
  round 6 hole 3.2: 0(54.844,2.088) 0(152.947,0.491) 0(152.947,88.491) 1(54.844,87.088) 2(24.844,87.088) 3(24.844,2.088)

## Via types
v1: diameter 0.5, hole 0.2, TopLayer to BottomLayer, tented both sides, 659 vias
v2: diameter 0.6, hole 0.3, TopLayer to BottomLayer, tented both sides, 56 vias
v3: diameter 1, hole 0.6, TopLayer to BottomLayer, tented both sides, 26 vias
v4: diameter 0.6, hole 0.3, TopLayer to BottomLayer, 18 vias
v5: diameter 1, hole 0.5, TopLayer to BottomLayer, tented both sides, 9 vias
v6: diameter 0.5, hole 0.2, TopLayer to BottomLayer, tented bottom, 7 vias
v7: diameter 0.5, hole 0.2, TopLayer to BottomLayer, 4 vias

## Nets (pads, with @x,y where several pads share a name; then routed paths per layer and width w, separated by ;. In a path a pad name is that pad's centre, name@x,y a point inside that pad or via, vN(x,y) a via of type N, cw(c..) or ccw(c..) an arc to the next point about the centre after c; other vN are vias at no path point)
BUSY: IC5.2 IC18.2 R51.1 | length 10.1
  BottomLayer w0.127: IC18.2@101.426,8.288 IC5.2@101.426,7.113 101.426,6.309 102.239,5.496 105.897,5.496 106.11,5.709 106.11,5.9 107.698,7.488 R51.1@108.274,7.488
CLRn: IC5.64 IC18.64 R88.1 TP15.1 | length 46.6
  TopLayer w0.127: v1(132.544,24.088) 132.544,20.088 133.144,19.488 R88.1@133.974,19.488 133.994,19.468 TP15.1@133.994,17.938
  Signal Layer 1 w0.127: v1(103.367,7.928) 104.054,7.928 104.494,7.488 109.744,7.488 v1(114.244,11.988)
  BottomLayer w0.127: IC18.64@102.626,8.988 102.626,8.729 102.884,8.471 102.884,8.411 v1(103.367,7.928) ; IC18.64@102.844,8.988 IC5.64@103.801,8.988 ; v1(114.244,11.988) 115.044,11.988 121.444,18.388 121.444,18.773 127.408,24.738 131.894,24.738 v1(132.544,24.088)
CSn: IC5.53 IC18.53 R97.1 TP4.1 | length 39.2
  TopLayer w0.152: v1(129.942,30.818) 129.942,30.912 130.085,31.056 130.085,31.229 TP4.1@130.644,31.788 131.648,31.788 R97.1@132.626,30.81
  BottomLayer w0.152: IC18.53@102.626,14.488 102.626,14.476 104.811,14.476 104.883,14.404 106.161,14.404 107.052,15.294 107.052,15.329 108.557,16.834 108.557,18.36 110.938,20.741 111.932,20.741 112.435,20.238 117.994,20.238 122.641,24.885 122.641,25.026 126.803,29.188 128.312,29.188 v1(129.942,30.818)
CSN_EXT: IC23.12 R99.1 R118.2 TP18.1 | length 142.4
  TopLayer w0.127: IC23.12@16.657,0.369 18.089,0.369 v1(18.132,0.327) ; v1(115.244,9.588) 115.344,9.488 TP18.1@116.444,9.488 ; R99.1@132.626,27.762 132.626,27.006 v1(132.644,26.988)
  Signal Layer 1 w0.127: v1(18.132,0.327) 18.386,0.327 20.631,-1.918 114.311,-1.918 115.287,-0.943 v1@115.287,9.588
  BottomLayer w0.127: R118.2@16.494,-0.012 17.792,-0.012 v1(18.132,0.327) ; v1(115.244,9.588) 116.044,9.588 126.144,19.688 130.444,19.688 133.244,22.488 133.244,26.388 v1(132.644,26.988)
DAC_OUT_N1: J1.35 J3.2 L4_1.3 | length 68.3
  TopLayer w0.152: J1.35@-1.201,26.289 -0.718,26.289 2.638,22.933 3.984,22.933 6.176,20.742 6.27,20.742 14.779,12.233 14.779,11.25 15.973,10.056 17.851,10.056 18.054,9.852 17.156,8.954 J3.2@16.936,8.954 18.054,7.837 18.054,6.424 18.868,5.611 26.151,5.611 26.733,5.029 27.222,5.029 31.34,0.912 39.594,0.912 43.049,4.367 43.049,8.988 42.63,9.407 42.58,9.356 41.427,9.356 41.362,9.291 40.579,9.291 40.49,9.381 L4_1.3@40.49,10.409
DAC_OUT_N2: J1.36 J3.5 L4_2.3 | length 84.3
  TopLayer w0.152: L4_2.3@65.29,7.909 65.7,7.909 66.495,7.114 v1(66.495,6.985)
  Signal Layer 1 w0.152: J1.36@0.704,27.559 0.971,27.826 3.025,27.826 3.771,28.572 6.447,28.572 15.515,19.504 15.515,13.408 15.896,13.027 18.259,13.027 ; J3.5@19.476,14.034 19.266,14.034 18.259,13.027 ; v1(66.495,6.985) 66.273,6.762 57.79,6.762 56.75,5.722 47.41,5.722 46.911,6.22 36.533,6.22 36.038,5.725 35.06,4.747 28.074,4.747 20.341,12.479 20.341,12.519 20.163,12.697 20.123,12.697 20.018,12.802 18.484,12.802 18.259,13.027
DAC_OUT_N3: J1.37 J3.8 L4_3.3 | length 68.5
  TopLayer w0.152: J1.37@-1.201,28.829 1.19,28.829 2.193,27.826 3.362,27.826 4.098,28.563 4.93,28.563 4.968,28.525 5.251,28.525 18.46,15.316 20.397,15.316 21.882,13.831 21.882,10.706 25.908,6.68 25.997,6.591 27.344,6.591 28.322,5.613 34.416,5.613 36.075,7.272 36.075,12.022 37.033,12.979 42.39,12.979 42.959,13.549 43.049,13.639 43.049,15.988 42.959,16.077 42.782,16.255 41.807,16.255 41.77,16.291 40.579,16.291 40.49,16.381 L4_3.3@40.49,17.409
DAC_OUT_N4: J1.38 J3.11 L4_4.3 | length 89.2
  TopLayer w0.152: L4_4.3@65.29,14.909 65.685,14.909 66.495,14.099 v1(66.495,13.985)
  Signal Layer 1 w0.152: J1.38@0.704,30.099 0.971,30.366 3.025,30.366 3.771,31.112 7.844,31.112 13.864,25.092 13.864,24.584 15.388,23.06 15.388,20.794 15.577,20.605 17.561,20.605 18.61,21.654 J3.11@19.476,21.654 18.694,20.872 18.694,20.488 19.952,20.488 20.784,19.656 20.784,16.44 21.516,15.708 21.516,13.676 21.606,13.586 25.961,9.23 29.48,5.712 34.66,5.712 35.639,6.69 41.849,12.9 58.694,12.9 59.556,13.762 66.273,13.762 v1(66.495,13.985)
DAC_OUT_N5: J1.39 J3.14 L4_5.3 | length 78.6
  TopLayer w0.152: J1.39@-1.201,31.369 1.19,31.369 2.193,30.366 3.362,30.366 4.098,31.103 9.404,31.103 14.614,25.893 15.106,25.401 17.838,25.401 17.927,25.311 17.927,25.185 J3.14@17.196,24.453 ; J3.14@16.936,24.194 J3.14@17.196,24.453 ; L4_5.3@40.49,24.409 40.49,23.381 40.579,23.291 42.746,23.291 43.485,22.552 43.485,20.77 42.149,19.434 38.408,19.434 36.944,17.97 36.944,14.988 34.544,12.588 34.544,8.281 33.4,7.137 29.04,7.137 23.317,12.86 23.317,21.209 21.869,22.658 18.701,22.658 18.05,23.309 18.05,23.688 18.065,23.703 18.065,23.908 17.965,24.008 17.605,24.008 17.196,24.418 J3.14@17.196,24.453
DAC_OUT_N6: J1.40 J3.17 L4_6.3 | length 94.9
  TopLayer w0.152: L4_6.3@65.29,21.909 65.746,21.909 66.495,21.16 v1(66.495,20.985) v1@66.37,21.11
  Signal Layer 1 w0.152: J1.40@0.704,32.639 0.971,32.906 3.362,32.906 4.098,33.643 5.042,33.643 5.305,33.906 10.257,33.906 16.023,28.14 18.342,28.14 J3.17@19.476,29.274 19.476,28.883 19.072,28.479 19.072,28.439 18.4,27.767 18.4,26.202 18.871,25.731 20.304,25.731 21.154,24.881 21.154,20.651 21.75,20.056 21.75,16.839 22.481,16.107 22.481,14.075 26.213,10.344 34.258,10.344 34.478,10.564 34.591,10.564 34.718,10.691 34.718,15.422 39.27,19.974 61.985,19.974 62.773,20.762 66.273,20.762 v1(66.495,20.985)
DAC_OUT_N7: J1.41 J3.20 L4_7.3 | length 68.7
  TopLayer w0.152: J1.41@-1.201,33.909 1.19,33.909 2.193,32.906 3.362,32.906 4.098,33.643 6.102,33.643 6.321,33.424 15.592,33.424 15.884,33.132 15.973,33.043 17.751,33.043 17.789,33.005 17.789,32.667 J3.20@16.936,31.814 17.328,31.814 17.682,31.46 17.732,31.46 18.054,31.139 18.054,30.554 18.233,30.376 21.434,30.376 22.323,29.487 23.867,29.487 24.655,30.275 v1(24.655,30.299) ; L4_7.3@40.165,31.409 L4_7.3@40.49,31.409 40.803,31.409 41.695,30.517 v1(41.695,30.485)
  Signal Layer 1 w0.152: v1(24.655,30.299) 24.482,30.126 24.482,21.419 27.92,17.98 34.134,17.98 36.496,20.343 36.496,22.498 37.42,23.422 37.509,23.512 37.509,26.622 41.149,30.262 41.473,30.262 v1(41.695,30.485)
DAC_OUT_N8: J1.42 J3.23 L4_8.3 | length 94.4
  TopLayer w0.152: L4_8.3@65.29,28.909 65.731,28.909 66.495,28.145 v1(66.495,27.985) v1@66.37,28.11
  Signal Layer 1 w0.152: J1.42@0.704,35.179 2.077,35.179 2.344,35.446 3.362,35.446 3.511,35.595 4.099,36.183 4.93,36.183 5.319,35.793 18.375,35.793 J3.23@19.476,36.894 ; v1(21.899,33.432) 21.899,33.186 22.323,32.762 22.412,32.673 22.412,28.101 23.085,27.428 23.085,21.451 23.68,20.856 23.68,17.639 26.281,15.038 28.657,15.038 29.189,15.571 33.502,15.571 36.496,18.565 36.496,18.978 37.461,19.943 37.461,21.026 38.474,22.04 38.474,24.612 40.694,26.832 60.715,26.832 61.645,27.762 66.273,27.762 v1(66.495,27.985)
  BottomLayer w0.152: J3.23@19.476,36.894 19.476,36.371 20.164,35.684 20.366,35.684 20.926,35.125 20.926,34.49 21.899,33.517 v1(21.899,33.432)
DAC_OUT_N9: J1.43 J4.2 L4_9.3 | length 138.4
  TopLayer w0.152: J1.43@-1.201,36.449 1.19,36.449 2.193,35.446 3.362,35.446 4.098,36.183 6.102,36.183 6.702,35.583 20.672,35.583 25.498,30.757 25.498,13.231 28.076,10.653 28.542,10.186 31.051,10.186 31.491,9.747 31.491,9.62 30.825,8.954 J4.2@30.436,8.954 ; L4_9.3@88.49,29.159 88.926,29.159 89.695,28.389 v1(89.695,28.235)
  Signal Layer 1 w0.152: J4.2@30.436,8.954 30.589,8.801 31.465,8.801 31.554,8.712 31.554,7.44 32.622,6.373 34.387,6.373 35.365,7.351 35.708,7.694 35.708,9.181 44.792,18.264 55.05,18.264 55.058,18.256 55.686,18.256 55.694,18.264 58.65,18.264 59.176,17.738 62.262,17.738 63.648,19.123 67.077,19.123 67.75,19.797 67.839,19.886 67.839,21.41 68.004,21.575 68.093,21.664 68.093,25.347 70.104,27.358 70.104,29.032 71.374,30.302 78.994,30.302 79.96,29.336 90.932,29.336 91.194,29.074 91.194,28.403 90.93,28.139 89.791,28.139 v1(89.695,28.235)
DAC_OUT_N10: J1.44 J4.5 L4_10.3 | length 90
  TopLayer w0.152: J4.5@32.976,14.034 33.953,15.011 34.416,15.011 34.907,15.502 34.996,15.591 34.996,19.324 36.14,20.468 36.14,33.422 36.779,34.061 42.036,34.061 42.959,34.985 43.049,35.074 43.049,36.988 42.959,37.077 42.642,37.395 41.465,37.395 41.361,37.291 40.579,37.291 40.49,37.381 L4_10.3@40.49,38.409
  Signal Layer 1 w0.152: J1.44@0.704,37.719 0.971,37.986 3.025,37.986 3.898,38.859 16.093,38.859 16.521,38.431 20.144,38.431 21.715,36.861 21.715,34.181 20.777,33.244 20.777,32.697 21.192,32.282 21.192,27.956 21.281,27.867 22.119,27.029 22.119,21.051 22.715,20.456 22.715,17.239 26.923,13.031 30.852,13.031 30.975,13.154 32.356,13.154 32.976,13.775 J4.5@32.976,14.034
DAC_OUT_N11: J1.45 J4.8 L4_11.3 | length 104.2
  TopLayer w0.152: J1.45@-1.201,38.989 1.19,38.989 2.193,37.986 3.362,37.986 4.098,38.723 15.798,38.723 16.395,38.126 20.018,38.126 20.395,38.504 21.992,38.504 25.853,34.643 25.853,33.691 27.403,32.141 27.403,19.835 29.431,17.806 31.157,17.806 31.554,17.409 31.554,16.864 31.465,16.775 30.637,16.775 J4.8@30.436,16.574 ; L4_11.3@65.29,35.909 65.571,35.909 66.022,35.458 66.167,35.458 66.495,35.13 v1(66.495,34.985)
  Signal Layer 1 w0.152: v1(34.798,21.158) 34.832,21.158 35.061,20.93 35.246,20.93 35.531,21.214 35.531,22.898 36.455,23.822 36.544,23.911 36.544,27.181 38.011,28.648 38.011,31.484 40.383,33.855 59.991,33.855 60.898,34.762 66.273,34.762 v1(66.495,34.985)
  BottomLayer w0.152: J4.8@30.436,16.574 31.465,16.574 31.554,16.664 31.554,19.879 32.098,20.422 33.824,20.422 33.923,20.521 33.923,20.539 34.282,20.899 34.504,20.899 34.764,21.158 v1(34.798,21.158)
DAC_OUT_N12: J1.46 J4.11 L4_12.3 | length 126
  TopLayer w0.152: L4_12.3@88.49,36.159 88.885,36.159 89.599,35.446 89.599,35.331 v1(89.695,35.235)
  Signal Layer 1 w0.152: J1.46@0.704,40.259 0.971,40.526 3.025,40.526 4.152,41.653 22.195,41.653 25.802,38.046 25.802,24.203 27.072,22.933 29.48,22.933 29.509,22.962 31.233,22.962 31.746,22.449 31.746,20.879 31.974,20.651 ; J4.11@32.976,21.654 31.974,20.651 ; v1(89.695,35.235) 89.319,35.235 89.055,35.499 88.54,36.014 88.45,36.104 80.736,36.104 79.758,37.081 61.032,37.081 58.642,39.472 42.417,39.472 37.307,34.362 37.278,34.362 36.597,33.681 36.597,29.03 35.579,28.012 35.579,24.311 33.985,22.717 33.985,21.007 33.401,20.422 32.203,20.422 31.974,20.651
DAC_OUT_N13: J1.47 J4.14 L4_13.3 | length 82.7
  TopLayer w0.152: J1.47@-1.201,41.529 1.19,41.529 2.193,40.526 3.362,40.526 4.098,41.263 5.65,41.263 5.939,41.552 13.568,41.552 14.186,40.933 22.23,40.933 26.818,36.345 26.818,34.091 28.419,32.49 28.419,26.566 29.562,25.423 31.186,25.423 31.425,25.183 31.64,24.969 31.64,24.518 31.465,24.344 30.586,24.344 J4.14@30.436,24.194 30.649,23.982 31.551,23.982 31.64,23.893 31.64,23.468 31.917,23.191 32.427,22.681 34.379,22.681 34.907,23.208 34.907,37.269 37.795,40.157 41.759,40.157 43.049,41.447 43.049,43.626 42.384,44.291 40.579,44.291 40.49,44.381 L4_13.3@40.49,45.409
DAC_OUT_N14: J1.48 J4.17 L4_14.3 | length 91.9
  TopLayer w0.152: L4_14.3@65.29,42.909 L4_14.3@65.571,42.909 ; L4_14.3@65.571,42.909 65.701,42.909 66.495,42.115 v1(66.495,41.985) L4_14.3@65.571,42.909
  Signal Layer 1 w0.152: J1.48@0.704,42.799 0.971,43.066 3.025,43.066 4.152,44.193 22.957,44.193 27.199,39.951 27.199,29.918 28.85,28.267 32.976,28.267 J4.17@32.976,29.274 ; 32.976,28.206 33.14,28.042 33.782,28.042 35.417,29.677 35.417,35.271 41.164,41.018 63.108,41.018 63.852,41.762 66.273,41.762 v1(66.495,41.985)
DAC_OUT_N15: J1.49 J4.20 L4_15.3 | length 111.1
  TopLayer w0.152: J1.49@-1.201,44.069 -0.842,43.711 0.196,43.711 0.288,43.803 1.457,43.803 2.193,43.066 3.362,43.066 4.098,43.803 4.93,43.803 5.022,43.711 10.691,43.711 11.199,43.203 17.301,43.203 17.42,43.322 23.905,43.322 27.784,39.443 27.784,34.49 29.358,32.916 31.194,32.916 31.36,32.749 31.36,32.738 J4.20@30.436,31.814 ; L4_15.3@88.49,43.159 88.997,43.159 v1(89.84,42.316)
  Signal Layer 1 w0.152: J4.20@30.436,31.814 31.715,33.093 34.007,33.093 34.294,33.381 34.294,33.889 34.337,33.931 34.337,36.699 40.002,42.364 46.783,42.364 47.418,42.999 58.848,42.999 59.915,44.066 79.883,44.066 80.717,43.232 84.021,43.232 85.013,42.24 89.764,42.24 v1(89.84,42.316)
DAC_OUT_N16: J1.50 J4.23 L4_16.3 | length 76.2
  TopLayer w0.152: J4.23@32.976,36.894 32.022,35.94 31.895,35.94 31.75,36.085 31.75,37.668 32.208,38.126 33.518,38.126 35.771,40.379 35.771,53.036 36.354,53.619 43.562,53.619 43.942,53.239 43.942,51.429 43.804,51.291 40.579,51.291 40.49,51.381 L4_16.3@40.49,52.409
  Signal Layer 1 w0.152: J1.50@0.704,45.339 0.971,45.606 3.025,45.606 3.898,46.479 6.384,46.479 7.375,45.488 10.627,45.488 11.194,46.056 23.634,46.056 28.85,40.84 28.85,37.062 30.021,35.891 31.973,35.891 J4.23@32.976,36.894
DAC_OUT_N17: J1.53 J5.2 L4_17.3 | length 81.7
  TopLayer w0.152: J1.53@-1.201,49.149 -0.934,48.883 1.457,48.883 2.193,48.146 3.362,48.146 4.098,48.883 6.058,48.883 7.203,47.738 9.629,47.738 12.526,44.841 12.615,44.752 16.679,44.752 17.144,44.287 23.913,44.287 28.139,48.513 28.139,49.782 29.544,51.186 31.662,51.186 31.975,50.873 31.975,50.746 31.616,50.388 31.344,50.388 30.91,49.954 J5.2@30.436,49.954 ; L4_17.3@65.29,49.909 65.661,49.909 66.495,49.075 v1(66.495,48.985)
  Signal Layer 1 w0.152: J5.2@30.436,49.954 31.424,50.942 31.424,50.983 31.932,51.491 34.532,51.491 38.02,48.003 62.585,48.003 63.344,48.762 66.273,48.762 v1(66.495,48.985)
DAC_OUT_N18: J1.54 J5.5 L4_18.3 | length 102.1
  TopLayer w0.152: L4_18.3@88.49,50.159 89.82,50.159 90.068,49.911 v1(90.068,49.53)
  Signal Layer 1 w0.152: J1.54@0.704,50.419 0.971,50.686 3.025,50.686 3.527,51.188 3.864,51.188 4.098,51.423 5.567,51.423 6.066,50.924 9.622,50.924 9.711,50.835 13.525,47.021 24.312,47.021 27.403,50.111 27.403,52.628 28.696,53.921 28.785,54.011 34.603,54.011 35.397,53.216 50.872,53.216 53.787,50.301 59.292,50.301 59.737,50.746 59.827,50.836 76.911,50.836 78.362,49.385 80.043,49.385 80.772,50.114 85.775,50.114 86.537,49.352 89.891,49.352 v1(90.068,49.53) ; 32.976,54.031 J5.5@32.976,55.034
DAC_OUT_N19: J1.55 J5.8 L4_19.3 | length 67.3
  TopLayer w0.152: J1.55@-1.201,51.689 1.19,51.689 2.193,50.686 3.025,50.686 3.974,51.635 7.096,51.635 12.925,45.806 13.015,45.717 17.079,45.717 17.544,45.252 23.513,45.252 27.174,48.913 27.174,50.836 27.301,50.963 27.707,51.369 27.707,57.401 29.113,58.806 30.659,58.806 30.704,58.762 31.263,58.202 31.554,57.911 31.554,57.664 31.465,57.574 ; J5.8@30.436,57.574 31.465,57.574 ; L4_19.3@40.49,59.409 40.525,59.409 41.049,58.885 41.049,58.381 41.138,58.291 42.746,58.291 42.836,58.201 43.049,57.988 43.049,55.541 42.426,54.919 37.133,54.919 36.014,56.038 32.628,56.038 31.554,57.111 31.554,57.485 31.465,57.574
DAC_OUT_N20: J1.56 J5.11 L4_20.3 | length 86.3
  TopLayer w0.152: L4_20.3@65.29,56.909 65.571,56.909 v1(66.495,55.985)
  Signal Layer 1 w0.152: J1.56@0.704,52.959 0.971,53.226 3.025,53.226 3.847,54.048 4.873,54.048 5.686,54.861 8.352,54.861 15.227,47.986 22.102,47.986 25.879,51.762 25.879,54.302 25.625,54.556 25.535,54.646 25.535,57.946 25.625,58.035 29.017,61.427 29.106,61.517 32.976,61.517 33.04,61.517 ; J5.11@32.976,62.654 32.976,61.581 33.04,61.517 ; v1(66.495,55.985) 66.455,55.985 66.185,55.715 65.98,55.715 65.973,55.708 62.909,55.708 61.935,54.734 55.724,54.734 55.686,54.772 55.058,54.772 55.02,54.734 38.782,54.734 34.284,59.231 34.284,59.573 34.284,60.947 33.715,61.517 33.04,61.517
DAC_OUT_N21: J1.57 J5.14 L4_21.3 | length 125
  TopLayer w0.152: J1.57@-1.201,54.229 -0.842,53.871 0.196,53.871 0.288,53.963 1.457,53.963 2.193,53.226 3.362,53.226 4.098,53.963 8.248,53.963 10.689,51.522 10.689,49.408 13.325,46.772 13.414,46.682 17.478,46.682 17.944,46.217 23.113,46.217 26.209,49.313 26.209,51.236 26.336,51.363 26.425,51.452 26.425,64.451 28.342,66.367 31.467,66.367 31.554,66.28 31.554,66.113 30.635,65.194 J5.14@30.436,65.194 ; L4_21.3@88.49,57.159 88.891,57.159 89.695,56.355 v1(89.695,56.235)
  Signal Layer 1 w0.152: J5.14@30.436,65.194 30.436,65.427 31.682,66.672 33.701,66.672 34.388,65.986 34.388,64.462 40.56,58.29 47.672,58.29 48.993,56.969 58.721,56.969 59.534,57.782 76.688,57.782 77.148,58.242 77.237,58.331 79.408,58.331 79.498,58.242 80.593,57.147 82.724,57.147 83.859,56.012 89.473,56.012 v1(89.695,56.235)
DAC_OUT_N22: J1.58 J5.17 L4_22.3 | length 66.3
  TopLayer w0.152: J5.17@32.976,70.274 32.12,69.418 32.12,69.048 32.126,69.042 34.785,69.042 35.47,69.727 39.067,69.727 39.365,69.43 39.365,67.007 39.963,66.409 L4_22.3@40.49,66.409
  Signal Layer 1 w0.152: J1.58@0.704,55.499 0.971,55.766 3.025,55.766 4.025,56.766 9.876,56.766 12.417,54.225 12.417,52.651 16.117,48.951 20.781,48.951 24.482,52.651 24.482,58.589 26.31,60.418 26.31,67.23 28.165,69.085 31.787,69.085 J5.17@32.976,70.274
DAC_OUT_N23: J1.59 J5.20 L4_23.3 | length 111.7
  TopLayer w0.152: J1.59@-1.201,56.769 1.19,56.769 2.193,55.766 3.362,55.766 4.098,56.503 7.999,56.503 11.655,52.847 11.655,49.807 13.725,47.737 13.814,47.648 17.878,47.648 18.343,47.182 22.714,47.182 25.244,49.712 25.244,51.635 25.371,51.762 25.46,51.852 25.46,71.254 28.252,74.046 31.241,74.046 31.444,73.843 31.444,73.623 30.635,72.814 J5.20@30.436,72.814 ; L4_23.3@65.29,63.909 65.571,63.909 v1(66.495,62.985)
  Signal Layer 1 w0.152: J5.20@30.436,72.814 31.66,74.038 31.931,74.038 32.186,74.293 33.82,74.293 34.999,73.114 34.999,67.026 40.141,61.884 59.828,61.884 60.706,62.762 66.273,62.762 v1(66.495,62.985)
DAC_OUT_N24: J1.60 J5.23 L4_24.3 | length 126.4
  TopLayer w0.152: L4_24.3@88.49,64.159 88.927,64.159 89.695,63.39 v1(89.695,63.235)